# Altium PCB PCB pixel.pcbdoc
Units mil, origin at the board's own origin, x right, y up, seen from the top; angles counter-clockwise.
Board outline 4290 x 4535 mil, 2 copper layers (Top Layer, Bottom Layer); 29 components, 81 nets, 127 pads, 49 vias.
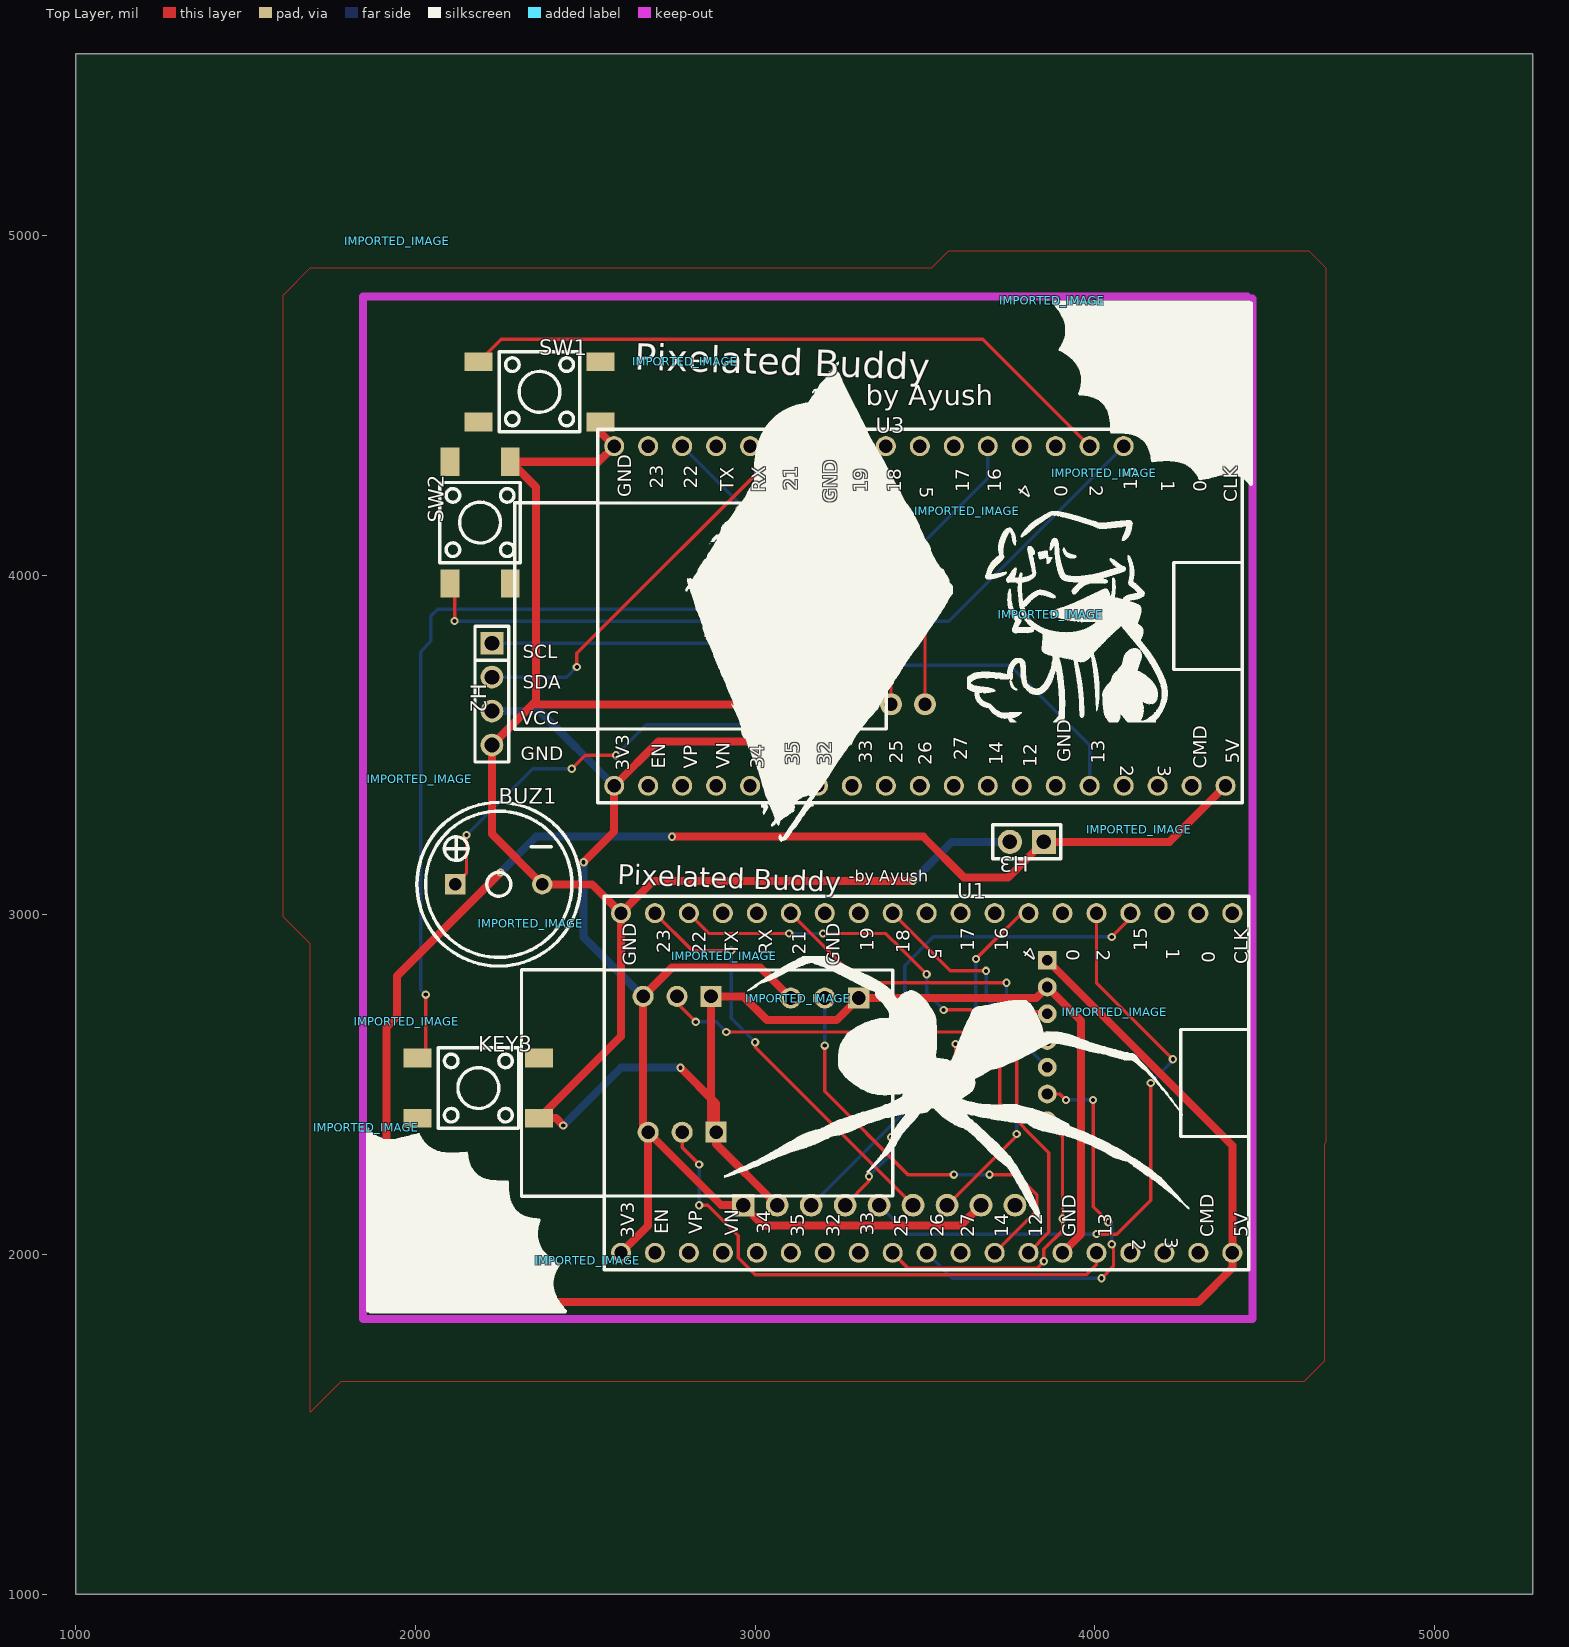
[diagram p0: Top Layer view]
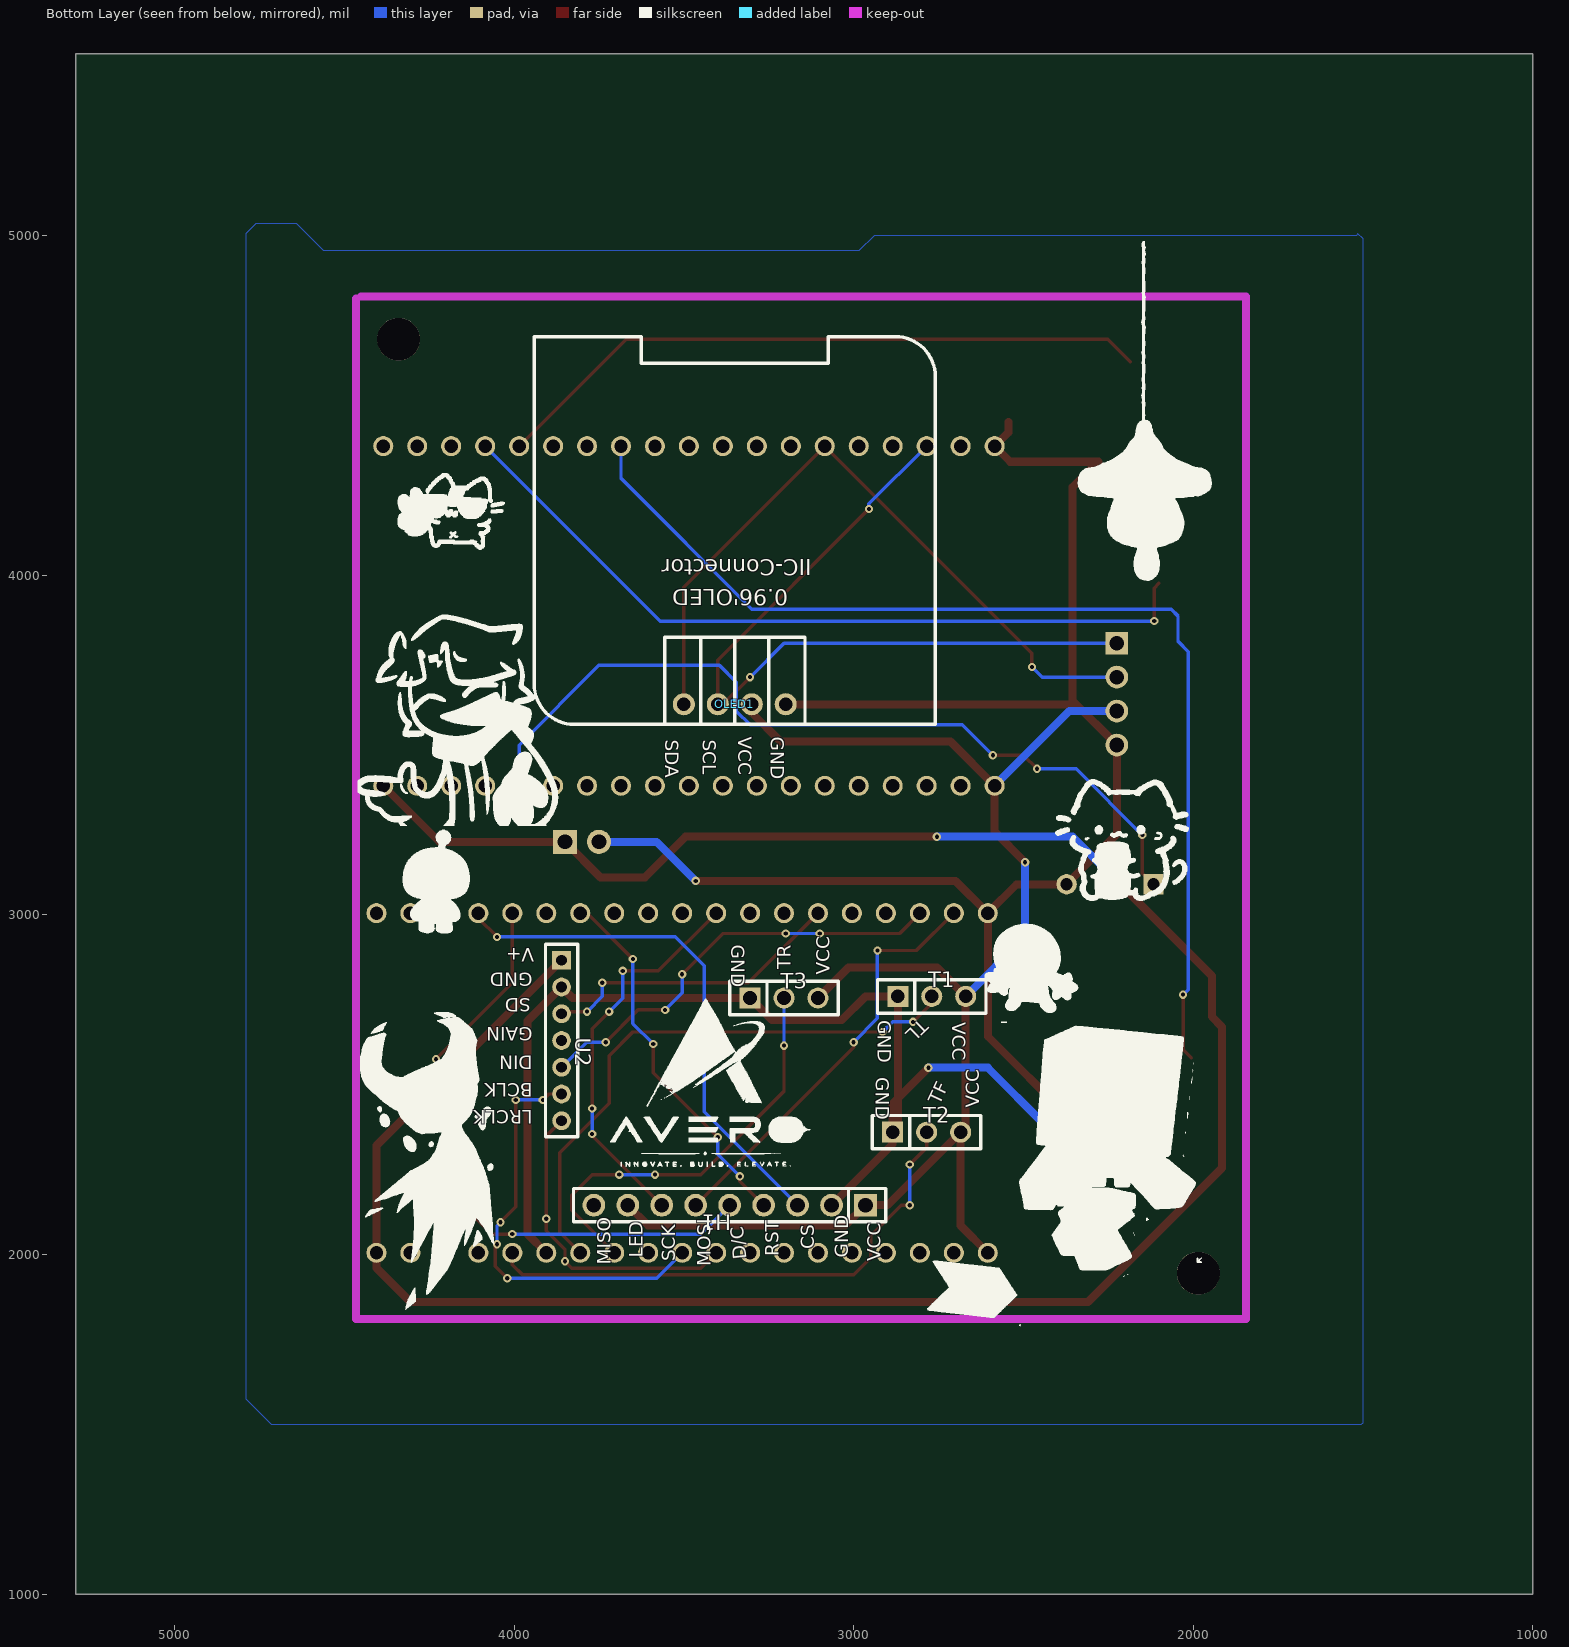
[diagram p1: Bottom Layer view, seen from below]

## Layer stack, top to bottom
Top Layer: signal copper (thickness not stored)
Dielectric: dielectric 12.6, FR-4, Dk 4.8
Bottom Layer: signal copper (thickness not stored)

## Board outline
5290,1000 1000,1000 1000,5535 5290,5535

## Components (designator, comment, footprint, x,y, rotation, side; value= is the part's Value field where it differs from the comment)
BUZ1 "CHENZJ1:BUZZER_12X9.5RM6.5" BUZ-TH_BD12.0-P6.50-D0.6_SEA-1285F 2245,3090 r0 top
H1 "Header-Female-2.54_1x9" HDR-TH_9P-P2.54-V-F-1 3365,2145 r180 bottom
H2 "Header-Male-2.54_1x4" HDR-TH_4P-P2.54-V-M 2225,3650 r270 top
H3 "Header-Male-2.54_1x2" HDR-TH_2P-P2.54-V-M-1 3800,3215 r180 top
IMPORTED_IMAGE "IMPORTED_IMAGE" IMPORTED_IMAGE 3126.71,2753.17 r0 top
IMPORTED_IMAGE "IMPORTED_IMAGE" IMPORTED_IMAGE 4130.86,3250.07 r0 top
IMPORTED_IMAGE "IMPORTED_IMAGE" IMPORTED_IMAGE 2338.87,2973.56 r0 top
IMPORTED_IMAGE "IMPORTED_IMAGE" IMPORTED_IMAGE 2507.67,1982.26 r0 top
IMPORTED_IMAGE "IMPORTED_IMAGE" IMPORTED_IMAGE 1974.7,2685.92 r0 top
IMPORTED_IMAGE "IMPORTED_IMAGE" IMPORTED_IMAGE 2013.1,3398.74 r0 top
IMPORTED_IMAGE "IMPORTED_IMAGE" IMPORTED_IMAGE 4027.53,4300.31 r0 top
IMPORTED_IMAGE "IMPORTED_IMAGE" IMPORTED_IMAGE 1945.98,4983.58 r0 top
IMPORTED_IMAGE "IMPORTED_IMAGE" IMPORTED_IMAGE 4058.93,2712.8 r0 top
IMPORTED_IMAGE "IMPORTED_IMAGE" IMPORTED_IMAGE 3870.45,3883.39 r0 top
IMPORTED_IMAGE "IMPORTED_IMAGE" IMPORTED_IMAGE 1854.79,2372.55 r0 top
IMPORTED_IMAGE "IMPORTED_IMAGE" IMPORTED_IMAGE 3874.57,4808.46 r0 top
IMPORTED_IMAGE "IMPORTED_IMAGE" IMPORTED_IMAGE 2794.4,4629.16 r0 top
IMPORTED_IMAGE "IMPORTED_IMAGE" IMPORTED_IMAGE 2909.74,2878.71 r0 top
IMPORTED_IMAGE "IMPORTED_IMAGE" IMPORTED_IMAGE 3624.2,4188.39 r0 top
KEY3 "4PINTACTPCBTHTPUSHBUTTON" SW-SMD_4P-L6.0-W6.0-P4.50-LS10.0_TL3301EF160QG 2185,2490 r0 top
OLED1 "0.96OLED_4P_MODULE_JX" 0.96OLED_4P 3350,3620 r180 bottom
SW1 "4PINTACTPCBTHTPUSHBUTTON" SW-SMD_4P-L6.0-W6.0-P4.50-LS10.0_TL3301EF160QG 2365,4540 r0 top
SW2 "4PINTACTPCBTHTPUSHBUTTON" SW-SMD_4P-L6.0-W6.0-P4.50-LS10.0_TL3301EF160QG 2190,4155 r90 top
T1 "Header-Female-2.54_1x3" HDR-TH_3P-P2.54-V-F 2770,2760 r0 bottom
T2 "Header-Female-2.54_1x3" HDR-TH_3P-P2.54-V-F 2785,2360 r0 bottom
T3 "Header-Female-2.54_1x3" HDR-TH_3P-P2.54-V-F 3205,2755 r0 bottom
U1 "ESP32-DEVKITC" BULETM-SMD_ESP32-DEVKITC 3505,2505 r0 top
U2 "HX PM2.0-1X7P ZC" HDR-TH_HX-PM2.0-1X7P-ZC 3860,2630 r90 bottom
U3 "ESP32-DEVKITC" BULETM-SMD_ESP32-DEVKITC 3485,3880 r0 top

## Footprints (in the part's own frame and the unit in brackets; to place one, negate y for a bottom-side part, rotate by r counter-clockwise, add the part's x,y. Pads: shape width x height; smd on the part's side, far side on the other; paste and mask are expansions set on the pad)
0.96OLED_4P [mm]
  round 1.65 hole 1 paste+0 mask+0.051: 1(3.81,0.001) 2(1.27,-0.002) 3(-1.27,-0.002) 4(-3.81,-0.002)
  silkscreen extent -15,-1.5 15,27.5
BULETM-SMD_ESP32-DEVKITC [mm]
  round 1.5 hole 1 paste+0 mask+0.05: 1(-22.86,-12.7) 2(-20.32,-12.7) 3(-17.78,-12.7) 4(-15.24,-12.7) 5(-12.7,-12.7) 6(-10.16,-12.7) 7(-7.62,-12.7) 8(-5.08,-12.7) 9(-2.54,-12.7) 10(0,-12.7) 11(2.54,-12.7) 12(5.08,-12.7) 13(7.62,-12.7) 14(10.16,-12.7) 15(12.7,-12.7) 16(15.24,-12.7) 17(17.78,-12.7) 18(20.32,-12.7) 19(22.86,-12.7) 20(-22.86,12.7) 21(-20.32,12.7) 22(-17.78,12.7) 23(-15.24,12.7) 24(-12.7,12.7) 25(-10.16,12.7) 26(-7.62,12.7) 27(-5.08,12.7) 28(-2.54,12.7) 29(0,12.7) 30(2.54,12.7) 31(5.08,12.7) 32(7.62,12.7) 33(10.16,12.7) 34(12.7,12.7) 35(15.24,12.7) 36(17.78,12.7) 37(20.32,12.7) 38(22.86,12.7)
  silkscreen extent -30.3,-13.97 24.1,13.97
BUZ-TH_BD12.0-P6.50-D0.6_SEA-1285F [mil]
  rect 60x60 hole 36 paste+0 mask+1.97: 1(-127.95,0)
  round 60 hole 36 paste+0 mask+1.97: 2(127.95,0)
  silkscreen extent -241,-241 241,241
HDR-TH_2P-P2.54-V-M-1 [mm]
  rect 1.8x1.8 hole 1.1 paste+0 mask+0.051: 1(-1.27,0)
  round 1.8 hole 1.1 paste+0 mask+0.051: 2(1.27,0)
  silkscreen extent -2.54,-1.27 2.54,1.27
HDR-TH_3P-P2.54-V-F [mil]
  rect 62x62 hole 40.16 paste+0 mask+2: 1(100,0)
  round 62 hole 40.16 paste+0 mask+2: 2(0,0) 3(-100,0)
  silkscreen extent -160,-49 160,49
HDR-TH_4P-P2.54-V-M [mm]
  rect 1.7x1.7 hole 1.1 paste+0 mask+0.051: 1(-3.81,0)
  round 1.7 hole 1.1 paste+0 mask+0.051: 2(-1.27,0) 3(1.27,0) 4(3.81,0)
  silkscreen extent -5.08,-1.27 5.08,1.27
HDR-TH_9P-P2.54-V-F-1 [mm]
  rect 1.7x1.7 hole 1.1 paste+0 mask+0.051: 1(10.16,0)
  round 1.7 hole 1.1 paste+0 mask+0.051: 2(7.62,0) 3(5.08,0) 4(2.54,0) 5(0,0) 6(-2.54,0) 7(-5.08,0) 8(-7.62,0) 9(-10.16,0)
  silkscreen extent -11.68,-1.25 11.68,1.25
HDR-TH_HX-PM2.0-1X7P-ZC [mm]
  rect 1.4x1.4 hole 0.8 paste+0 mask+0.051: 1(6,0)
  round 1.4 hole 0.8 paste+0 mask+0.051: 2(4,0) 3(2,0) 4(0,0) 5(-2,0) 7(-6,0)
  round 1.4 hole 0.838 paste+0 mask+0.051: 6(-4,0)
  silkscreen extent -7.2,-1.2 7.2,1.2
IMPORTED_IMAGE [mil]
SW-SMD_4P-L6.0-W6.0-P4.50-LS10.0_TL3301EF160QG [mm]
  rect 2.1x1.4 smd paste+0 mask+0.051: 1(-4.55,2.25) 2(4.55,2.25) 3(-4.55,-2.25) 4(4.55,-2.25)
  silkscreen extent -3,-3 3,3

## Free pads (board coordinates)
  round 125.98 hole 125.98 unplated paste+0: ""(1985,1945) ""(4340,4695)

## Via types
v1: diameter 24.41, hole 12.2, Top Layer to Bottom Layer, tented both sides, 49 vias

## Nets (pads, with @x,y where several pads share a name; then routed paths per layer and width w, separated by ;. In a path a pad name is that pad's centre, name@x,y a point inside that pad or via, vN(x,y) a via of type N, cw(c..) or ccw(c..) an arc to the next point about the centre after c; other vN are vias at no path point)
2: SW1.1 U3.34 | length 1957.1
  Top Layer w10: SW1.1 2252.29,4695 3670,4695 U3.34
15: SW2.1 U3.35 | length 2299.8
  Top Layer w10: SW2.1 2115,3962.29 v1(2115,3865)
  Bottom Layer w10: v1(2115,3865) 3570,3865 U3.35
16: KEY3.1 U3.31 | length 3232.8
  Top Layer w10: KEY3.1 2030,2602.71 v1(2030,2765)
  Bottom Layer w10: v1(2030,2765) 2015,2780 2015,3775 2045,3805 2045,3880 2065,3900 3300,3900 3685,4285 U3.31
+5V: H3.1 U1.19 U2.1 U3.19 | length 7180.8
  Top Layer w10: U1.19 U1.19@4405,2010
  Top Layer w23.62: v1(2250,3125) 1945,2820 1945,2700 1915,2670 1915,2255 2310,1860 4305,1860 4405,1960 U1.19 4405,2321.22 U2.1 ; v1(2755,3230) 3495,3230 3615,3110 3745,3110 H3.1 4220,3215 U3.19
  Bottom Layer w23.62: v1(2250,3125) 2355,3230 v1(2755,3230)
BCLK: U1.10 U2.6 | length 1252.7
  Top Layer w10: U2.6 3897.48,2472.52 v1(3915,2455) ; v1(3995,2455) 3995,2140 v1(4040,2095) ; v1(4020,1930) 4055,1965 4055,1970 4055,2025 v1(4050,2030)
  Bottom Layer w10: U1.10 3580,1930 v1(4020,1930) ; v1(3915,2455) v1(3995,2455) ; v1(4040,2095) 4050,2085 v1(4050,2030)
BZ: BUZ1.1 U3.15 | length 2467.9
  Top Layer w10: BUZ1.1 2150,3122.95 v1(2150,3235) ; v1(2460,3430) 2500,3470 v1(2590,3470)
  Bottom Layer w10: v1(2150,3235) 2345,3430 v1(2460,3430) ; v1(2590,3470) 2680,3560 3305,3560 3345,3600 3345,3685 3395,3735 3750,3735 3985,3500 U3.15
CS: H1.3 U1.35 | length 1556.9
  Top Layer w10: v1(4050,2935) 4105,2990 U1.35
  Bottom Layer w10: H1.3 3440,2420 3440,2850 3525,2935 v1(4050,2935)
D/C: H1.5 U1.34 | length 1841.8
  Top Layer w10: v1(4005,2060) 4065,2060 4165,2160 v1(4165,2505) ; U1.34 4005,2800 v1(4230,2575)
  Bottom Layer w10: H1.5 3450,2060 3715,2060 v1(4005,2060) ; v1(4165,2505) 4230,2570 v1(4230,2575)
DIN: U1.22 U2.5 | length 1275.2
  Top Layer w10: U1.22 2865,2945 v1(3100,2945) ; v1(3200,2945) 3385,2945 3430,2900 v1(3505,2825) ; v1(3555,2720) 3635,2720 v1(3730,2625)
  Bottom Layer w10: v1(3100,2945) v1(3200,2945) ; v1(3505,2825) 3505,2770 v1(3555,2720) ; v1(3730,2625) 3786.26,2625 U2.5
GND: BUZ1.2 H1.2 H2.4 H3.2 KEY3.4 OLED1.1 SW1.4 SW2.4 T1.1 T2.1 T3.1 U1.14 U1.20 U2.2 U3.20 | length 8368.7
  Top Layer w10: T2.1 T2.1@2890,2360
  Top Layer w23.62: BUZ1.2@2372.84,3090.11 2225,3237.95 H2.4 ; BUZ1.2 2520,3090 U1.20 ; v1(2435,2380) 2413.58,2401.42 KEY3.4 2605,2642.29 U1.20 ; SW1.4 2544.13,4420.87 U3.20 2539.13,4334.13 SW2.4 2280.87,4334.13 2355,4260 2355,3630 H2.4 ; v1(2780,2550) 2885,2445 T2.1 ; H1.2 2885,2325 T2.1 ; OLED1.1 2345.05,3620.05 H2.4 ; v1(3465,3100) 2700,3100 U1.20 ; U1.14 3960,2060 3960,2687.48 U2.2 3827.52,2755 T3.1 3240,2690 3035,2690 2965,2760 T1.1 2870,2375 T2.1
  Bottom Layer w23.62: v1(2435,2380) 2605,2550 v1(2780,2550) ; v1(3465,3100) 3580,3215 H3.2
H1_9: H1.9
KEY3_2: KEY3.2
KEY3_3: KEY3.3
LRCLK: U1.9 U2.7 | length 927.1
  Top Layer w10: U1.9 3450,1960 3830,1960 v1(3850,1980) 3850,2015 3905,2070 v1(3905,2105) 3905,2348.78 U2.7
MOSI: H1.6 U1.21 | length 1242.2
  Top Layer w10: U1.21 2815,2895 v1(2930,2895) ; v1(3000,2625) 3000,2610 H1.6
  Bottom Layer w10: v1(2930,2895) 2930,2695 v1(3000,2625)
RS: H1.4 U1.32 | length 1095.4
  Top Layer w10: H1.4 3335,2215 v1(3335,2230) ; v1(3400,2345) 3590,2535 v1(3590,2620) ; v1(3650,2870) 3785,3005 U1.32
  Bottom Layer w10: v1(3335,2230) 3400,2295 v1(3400,2345) ; v1(3590,2620) 3650,2680 v1(3650,2870)
S$5089: 
SCK: H1.7 U1.28 | length 1157.6
  Top Layer w10: U1.28 3575,2835 v1(3680,2835) ; H1.7 3770,2350 v1(3770,2355) ; v1(3720,2715) 3770,2665 v1(3770,2430)
  Bottom Layer w10: v1(3680,2835) 3680,2755 v1(3720,2715) ; v1(3770,2355) v1(3770,2430)
SCL: H2.1 OLED1.3 U3.22 | length 2264.4
  Top Layer w10: v1(2955,4195) 3400,3750 3400,3619.95 3385.05,3619.95 v1(3305,3700)
  Bottom Layer w10: H2.1 3205,3800 v1(3305,3700) ; U3.22 2955,4210 v1(2955,4195)
SD]: U1.25 U2.3 | length 901.1
  Top Layer w10: U1.25 3310,2800 v1(3740,2800) ; v1(3785,2715) 3853.74,2715 U2.3
  Bottom Layer w10: v1(3740,2800) 3740,2760 v1(3785,2715)
SDA: H2.2 OLED1.4 U3.25 | length 2097
  Top Layer w10: v1(2475,3730) 2475,3770 U3.25 3500,3965 OLED1.4@3500,3619.95
  Bottom Layer w10: H2.2 2445,3700 v1(2475,3730)
SW1_2: SW1.2
SW1_3: SW1.3
SW2_2: SW2.2
SW2_3: SW2.3
TF: T2.2 U1.15 | length 1576.1
  Top Layer w10: T2.2 2785,2315 v1(2835,2265) ; v1(2835,2145) 2860,2145 2950,2055 2950,1990 2965,1975 3000,1940 3975,1940 4005,1970 U1.15
  Bottom Layer w10: v1(2835,2145) v1(2835,2265)
TL: T1.2 U1.13 | length 1699.1
  Top Layer w10: T1.2 2770,2740 v1(2825,2685) ; v1(2915,2655) 3650,2655 3720,2585 3720,2445 3865,2300 3865,2065 U1.13
  Bottom Layer w10: v1(2825,2685) 2885,2685 v1(2915,2655)
TR: T3.2 U1.12 | length 1248.1
  Top Layer w10: v1(3205,2615) 3205,2480 3450,2235 v1(3585,2235) ; v1(3690,2235) 3770,2235 3830,2175 3830,2130 U1.12
  Bottom Layer w10: v1(3205,2615) T3.2 ; v1(3585,2235) v1(3690,2235)
U1_2: U1.2
U1_3: U1.3
U1_4: U1.4
U1_5: U1.5
U1_6: U1.6
U1_7: U1.7
U1_8: U1.8
U1_11: U1.11
U1_16: U1.16
U1_17: U1.17
U1_18: U1.18
U1_23: U1.23
U1_24: U1.24
U1_26: U1.26
U1_27: U1.27
U1_29: U1.29
U1_30: U1.30
U1_31: U1.31
U1_33: U1.33
U1_36: U1.36
U1_37: U1.37
U1_38: U1.38
U2_4: U2.4
U3_2: U3.2
U3_3: U3.3
U3_4: U3.4
U3_5: U3.5
U3_6: U3.6
U3_7: U3.7
U3_8: U3.8
U3_9: U3.9
U3_10: U3.10
U3_11: U3.11
U3_12: U3.12
U3_13: U3.13
U3_14: U3.14
U3_16: U3.16
U3_17: U3.17
U3_18: U3.18
U3_21: U3.21
U3_23: U3.23
U3_24: U3.24
U3_26: U3.26
U3_27: U3.27
U3_28: U3.28
U3_29: U3.29
U3_30: U3.30
U3_32: U3.32
U3_33: U3.33
U3_36: U3.36
U3_37: U3.37
U3_38: U3.38
VCC: H1.1 H1.8 H2.3 OLED1.2 T1.3 T2.3 T3.3 U1.1 U3.1 | length 4451.7
  Top Layer w10: T2.3@2670,2375 T2.3
  Top Layer w23.62: v1(2495,3155) 2585,3245 U3.1 2715,3510 3215,3510 3300,3595 OLED1.2@3300,3619.95 ; U1.1 2685,2085 T2.3 ; T3.3 3015,2845 2755,2845 T1.3 2670,2375 T2.3 ; H1.8 3605,2085 3025,2085 H1.1 2900,2145 T2.3
  Bottom Layer w23.62: H2.3 2365,3600 U3.1 ; v1(2495,3155) 2495,2935 T1.3

## Polygon pours and split planes (outlines as drawn)
GND on Bottom Layer (solid): 1520,5000 2940,5000 2985,4955 4560,4955 4640,5035 4760,5035 4790,5005 4790,1575 4715,1500 1505,1500 1500,1505 1500,4990 1515,5005
GND on Top Layer (solid): 1710,4905 3520,4905 3570,4955 4630,4955 4680,4905 4680,2330 4675,2325 4675,1685 4615,1625 1780,1625 1690,1535 1690,2915 1610,2995 1610,4825 1690,4905

## Silkscreen, mask and mechanical layers (free items; w line width, h text height)
Top Overlay:
  text "Pixelated Buddy" at 2643.63,4605.65 h78.74 r358
  text "by Ayush" at 3325,4500.47 h59.05
  text "1" at 4195.31,4280 h39.37 r270
  text "0" at 4290.31,4280 h39.37 r270
  text "4" at 3789.07,4271.57 h39.37 r234
  text "0" at 3880.32,4265 h39.37 r270
  text "2" at 3985.32,4265 h39.37 r270
  text "5" at 3485.32,4260 h39.37 r270
  text "23" at 2729.68,4255 h39.37 r90
  text "22" at 2829.68,4255 h39.37 r90
  text "21" at 3124.68,4250 h39.37 r90
  text "15" at 4124.69,4250 h39.37 r90
  text "TX" at 2936.87,4247.81 h39.37 r90
  text "RX" at 3029.68,4245 h39.37 r90
  text "19" at 3329.68,4245 h39.37 r90
  text "18" at 3429.68,4245 h39.37 r90
  text "17" at 3629.68,4245 h39.37 r90
  text "16" at 3724.68,4245 h39.37 r90
  text "GND" at 2634.68,4230 h39.37 r90
  text "CLK" at 4419.69,4215 h39.37 r90
  text "GND" at 3240.28,4212.74 h39.37 r90
  text "SCL" at 2315,3755.32 h39.37
  text "SDA" at 2315,3665.32 h39.37
  text "VCC" at 2310,3560.32 h39.37
  text "GND" at 2310,3455.32 h39.37
  text "27" at 3624.68,3455 h39.37 r90
  text "GND" at 3929.68,3450 h39.37 r90
  text "33" at 3344.68,3445 h39.37 r90
  text "25" at 3434.68,3445 h39.37 r90
  text "13" at 4029.68,3445 h39.37 r90
  text "5V" at 4424.69,3445 h39.37 r90
  text "35" at 3129.68,3440 h39.37 r90
  text "32" at 3224.68,3440 h39.37 r90
  text "26" at 3519.68,3440 h39.37 r90
  text "14" at 3729.68,3440 h39.37 r90
  text "2" at 4075.32,3440 h39.37 r270
  text "3" at 4185.31,3440 h39.37 r270
  text "12" at 3829.68,3435 h39.37 r90
  text "EN" at 2734.68,3430 h39.37 r90
  text "VP" at 2829.68,3430 h39.37 r90
  text "VN" at 2924.68,3430 h39.37 r90
  text "34" at 3024.68,3430 h39.37 r90
  text "CMD" at 4329.69,3430 h39.37 r90
  text "3V3" at 2629.68,3425 h39.37 r90
  text "Pixelated Buddy" at 2593.97,3090.49 h59.05 r358
  text "-by Ayush" at 3275,3085 h59.05
  text "4" at 3804.07,2910.77 h39.37 r234
  text "5" at 3510.32,2902.1 h39.37 r270
  text "1" at 4210.31,2902.1 h39.37 r270
  text "0" at 3915.32,2899.2 h39.37 r270
  text "2" at 4005.32,2897.1 h39.37 r270
  text "19" at 3349.68,2892.1 h39.37 r90
  text "17" at 3644.68,2892.1 h39.37 r90
  text "16" at 3744.68,2892.1 h39.37 r90
  text "15" at 4154.69,2892.1 h39.37 r90
  text "0" at 4315.31,2892.1 h39.37 r270
  text "23" at 2749.68,2887.1 h39.37 r90
  text "18" at 3454.68,2887.1 h39.37 r90
  text "22" at 2854.68,2882.1 h39.37 r90
  text "TX" at 2949.68,2882.1 h39.37 r90
  text "RX" at 3049.68,2882.1 h39.37 r90
  text "21" at 3149.68,2882.1 h39.37 r90
  text "CLK" at 4449.69,2855 h39.37 r90
  text "GND" at 2649.68,2850 h39.37 r90
  text "GND" at 3249.68,2850 h39.37 r90
  text "EN" at 2744.68,2060 h39.37 r90
  text "VP" at 2844.68,2060 h39.37 r90
  text "34" at 3044.68,2060 h39.37 r90
  text "VN" at 2949.68,2055 h39.37 r90
  text "33" at 3349.68,2055 h39.37 r90
  text "35" at 3144.68,2050 h39.37 r90
  text "32" at 3249.68,2050 h39.37 r90
  text "25" at 3449.68,2050 h39.37 r90
  text "26" at 3554.68,2050 h39.37 r90
  text "27" at 3644.68,2050 h39.37 r90
  text "14" at 3744.68,2050 h39.37 r90
  text "12" at 3844.68,2050 h39.37 r90
  text "GND" at 3944.68,2050 h39.37 r90
  text "13" at 4049.68,2050 h39.37 r90
  text "3" at 4205.31,2050 h39.37 r270
  text "CMD" at 4349.69,2050 h39.37 r90
  text "5V" at 4449.69,2050.5 h39.37 r90
  text "3V3" at 2644.68,2047.1 h39.37 r90
  text "2" at 4110.31,2045 h39.37 r270
Bottom Overlay:
  text "GND" at 3244.68,3525 h39.37 r90
  text "VCC" at 3339.68,3525 h39.37 r90
  text "SCL" at 3444.68,3515 h39.37 r90
  text "SDA" at 3554.68,3515 h39.37 r90
  text "GND" at 3359.68,2912.1 h39.37 r90
  text "V+" at 3940,2901.78 h39.37 r180
  text "TR" at 3185.32,2839.2 h39.37 r270
  text "GND" at 3945,2829.68 h39.37 r180
  text "VCC" at 3070.32,2824.2 h39.37 r270
  text "SD" at 3950,2754.68 h39.37 r180
  text "TL" at 2803.67,2696.26 h39.37 r136
  text "GND" at 2929.68,2689.2 h39.37 r90
  text "VCC" at 2709.68,2684.2 h39.37 r90
  text "GAIN" at 3945,2669.68 h39.37 r180
  text "DIN" at 3945,2584.68 h39.37 r180
  text "GND" at 2934.68,2521.3 h39.37 r90
  text "BCLK" at 3945,2504.68 h39.37 r180
  text "TF" at 2747.16,2437.98 h39.37 r295
  text "VCC" at 2630.32,2432.1 h39.37 r270
  text "LRCLK" at 3945,2424.68 h39.37 r180
  text "CS" at 3115.32,2015 h39.37 r270
  text "RST" at 3220.32,1995 h39.37 r270
  text "GND" at 3015.32,1990 h39.37 r270
  text "LED" at 3620.32,1990 h39.37 r270
  text "D/C" at 3315.42,1987.06 h39.37 r264
  text "VCC" at 2920.32,1980 h39.37 r270
  text "SCK" at 3525.32,1980 h39.37 r270
  text "MISO" at 3715.32,1970 h39.37 r270
  text "MOSI" at 3420.32,1965 h39.37 r270

## Text inside footprints (layer, text, board x,y; h text height)
OLED1: Bottom Overlay "IIC-Connector" at 3123.4,4047.06 h47.24 r180; Bottom Overlay "0.96'OLED" at 3192.6,3958.57 h47.24 r180